# Altium PCB COMECA-PCBv1.PcbDoc
Units mm, origin at the board's own origin, x right, y up, seen from the top; angles counter-clockwise.
Board outline 177 x 172 mm, 2 copper layers (Top Layer, Bottom Layer); 114 components, 86 nets, 442 pads, 19 vias.
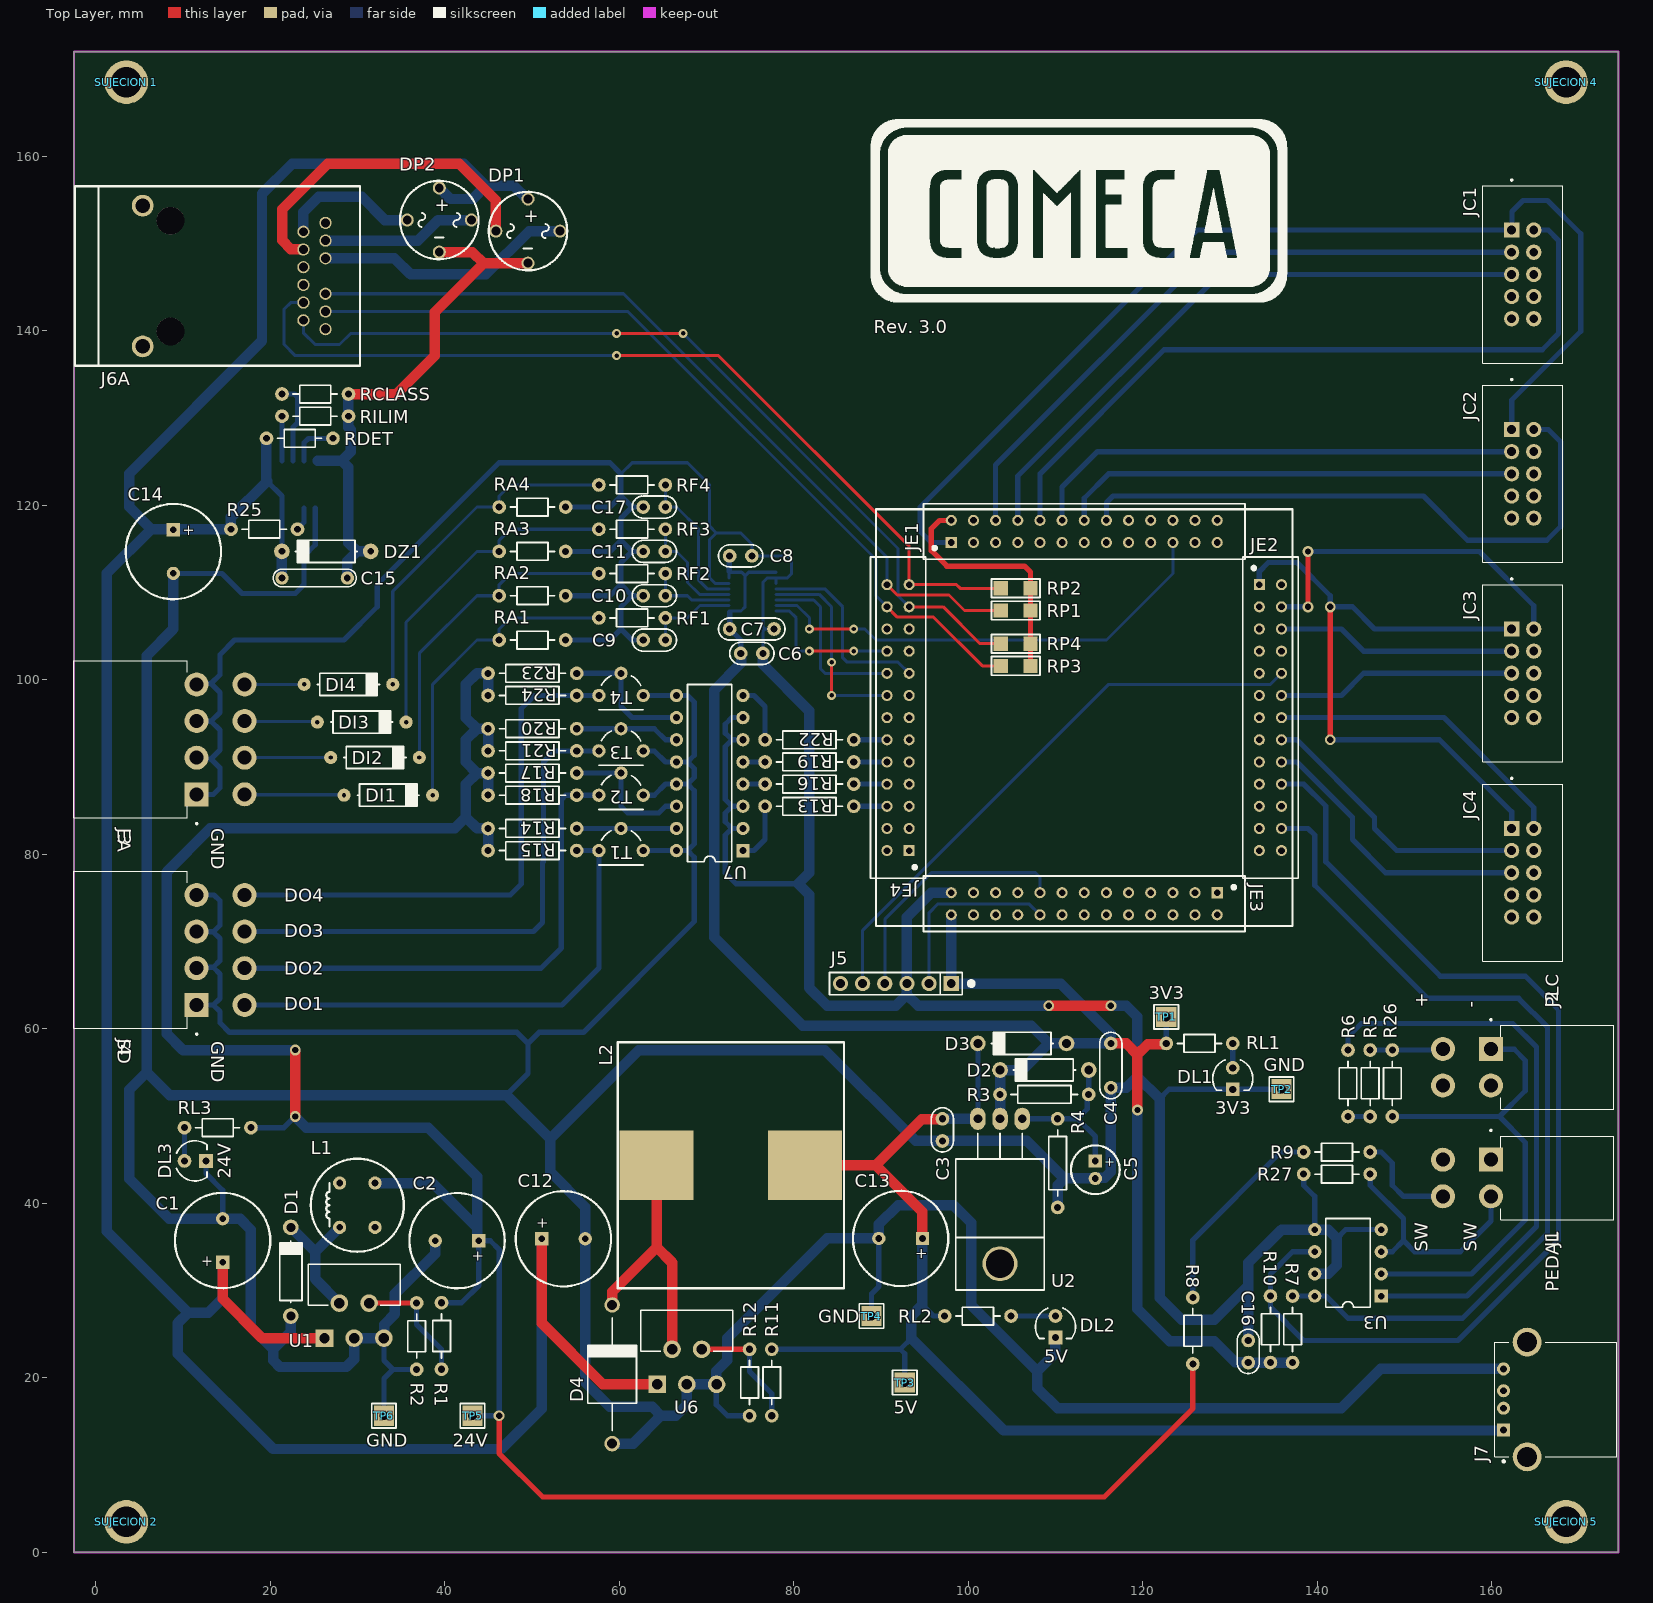
[diagram p0: Top Layer view]
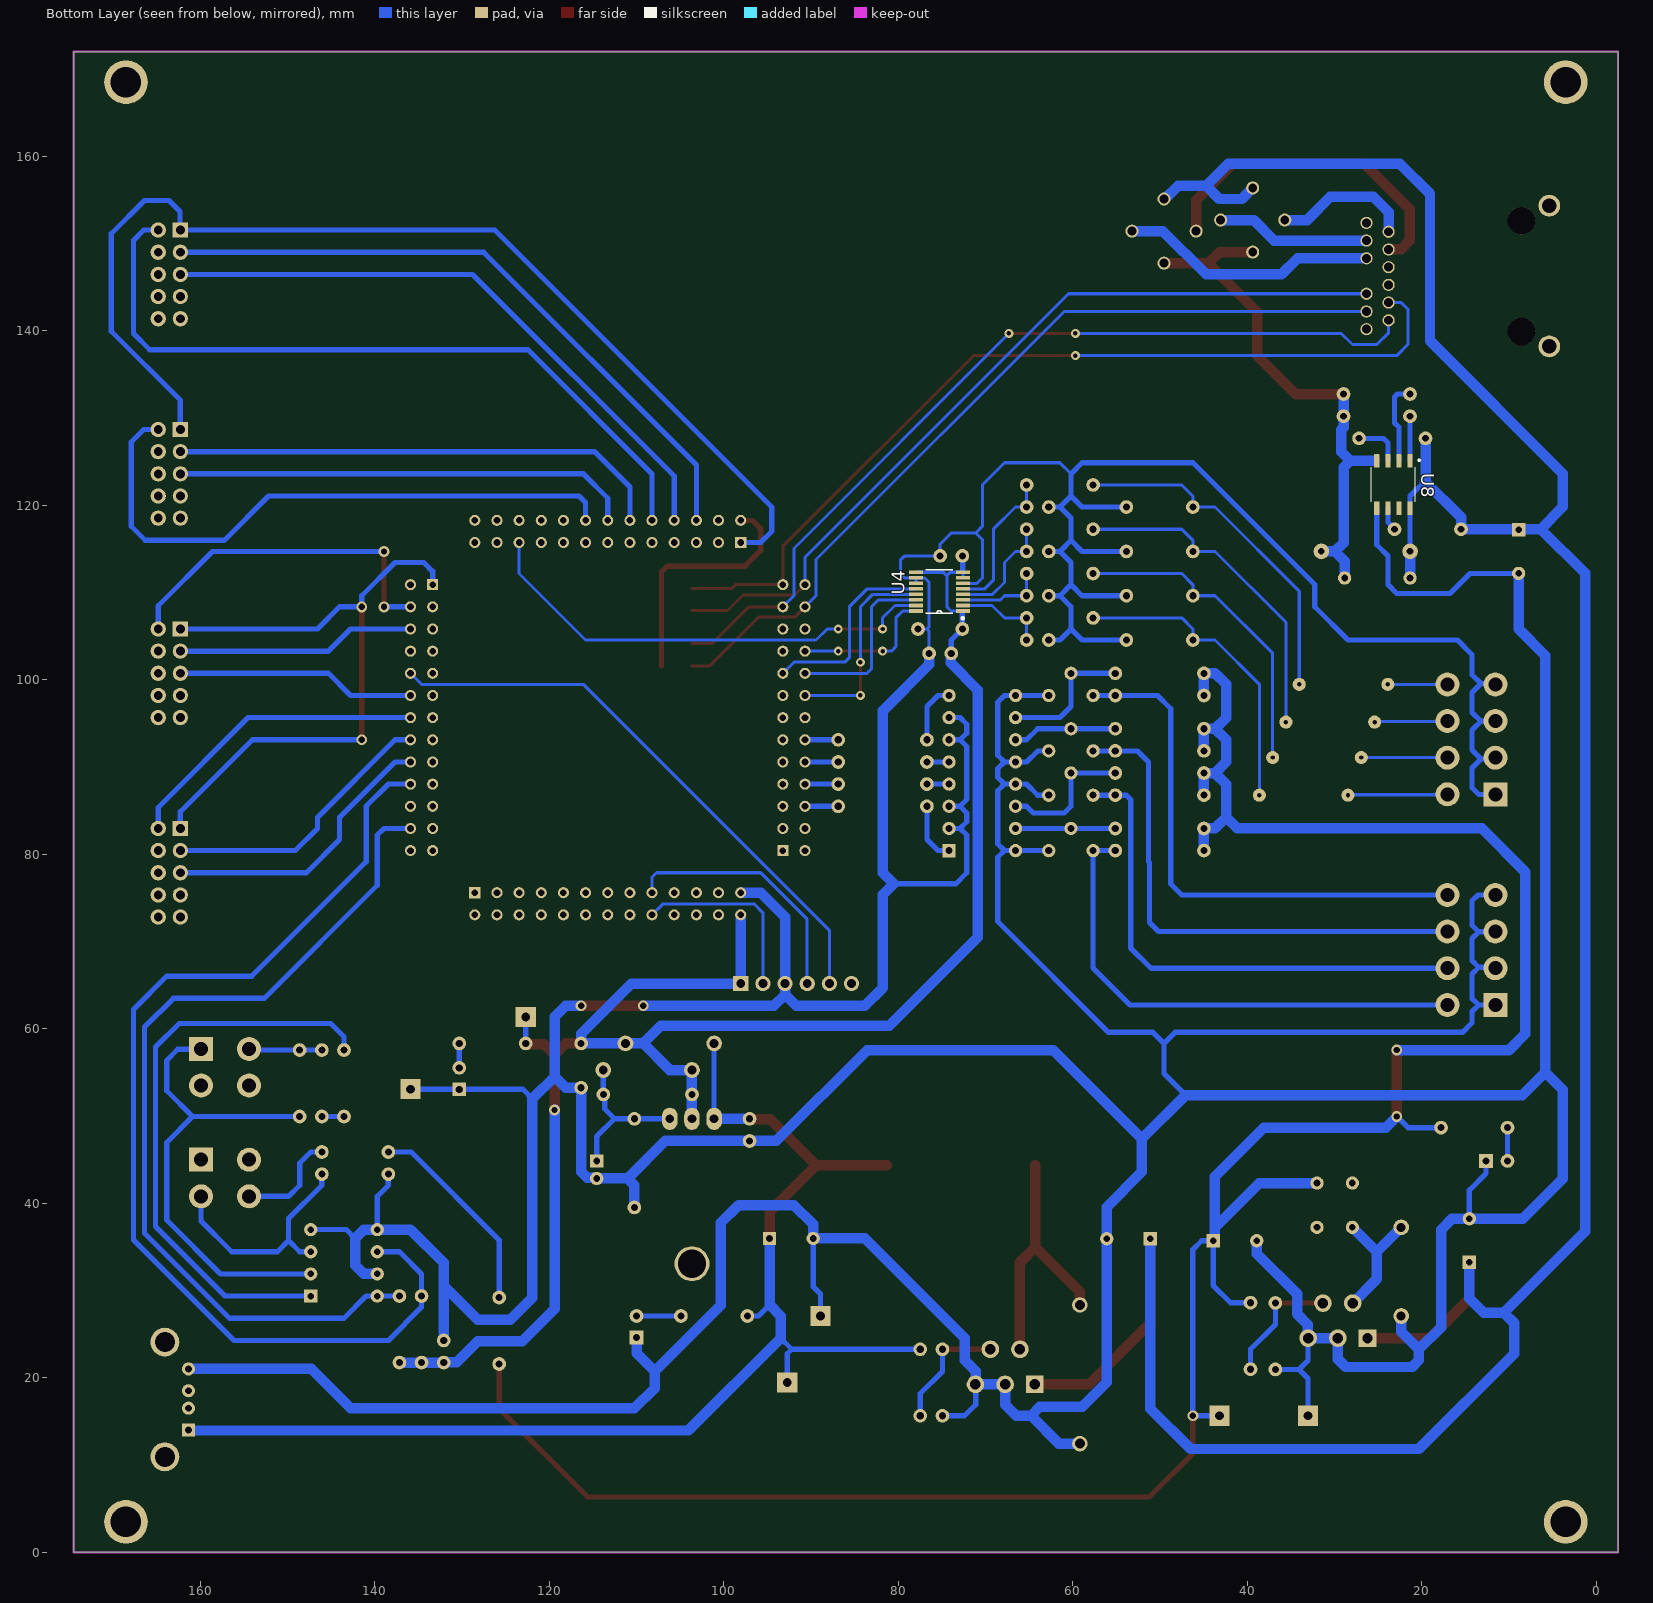
[diagram p1: Bottom Layer view, seen from below]

## Layer stack, top to bottom
Top Solder: solder mask 0.0102, Solder Resist, Dk 3.5
Top Layer: signal copper 0.0356
Dielectric 1: dielectric 0.32, FR-4, Dk 4.8
Bottom Layer: signal copper 0.0356
Bottom Solder: solder mask 0.0102, Solder Resist, Dk 3.5

## Board outline
-2.5,0 -2.5,172 174.5,172 174.5,0

## Design rules (kind name [scope] priority, off if disabled: settings)
Clearance [All] p1: gap=0.254 ignorepadtopadclearanceinfootprint=TRUE
ComponentClearance [All] p1: gap=0.22 collisioncheckmode=3 verticalgap=0.254 showdistances=FALSE
DiffPairsRouting [InDifferentialPairClass('All Differential Pairs')] p1: maxlimit=0.127 minlimit=0.127 mostfreqgap=0.127 toplayer_minwidth=0.127 toplayer_maxwidth=0.197 toplayer_prefwidth=0.197 bottomlayer_minwidth=0.127 bottomlayer_maxwidth=0.197 bottomlayer_prefwidth=0.197 maxuncoupledlength=12.7
MatchedLengths [InDifferentialPair ('RX')] p1: tolerance=25.4 checknetsindiffpair=FALSE checkdiffpairvsdiffpair=TRUE checkxsignals=TRUE checkothers=TRUE
PolygonConnect [All] p1: connectstyle=Relief reliefconductorwidth=0.254 reliefentries=4 polygonreliefangle="90 Angle" airgapwidth=0.254
RoutingVias [All] p1: holewidth=0.711 width=1.25 viastyle="Through Hole" minholewidth=0.508 minwidth=1 maxholewidth=0.711 maxwidth=1.25
SolderMaskExpansion [All] p1: expansion=0.102 istentingtop=FALSE
Width [All] p1: maxlimit=1.8 minlimit=0.35 preferedwidth=0.6
28 further rules are at their usual default settings.

## Classes and differential pairs
component class COMECA_Main: "SUJECION 1" "SUJECION 2" "SUJECION 4" "SUJECION 5"
component class U_UnidadDeControl-STM: J5 JE1 JE2 JE3 JE4
component class U_SalidasDigitales: J4 R13 R14 R15 R16 R17 R18 R19 R20 R21 R22 R23 R24 T1 T2 T3 T4 U7
component class U_Fuente24VDC: C1 C2 D1 DL3 L1 R1 R2 RL3 TP5 TP6 U1
component class U_Fuente5VDC: C12 C13 D4 DL2 J7 L2 R11 R12 RL2 TP3 TP4 U6
component class U_Fuente3.3VDC: C3 C4 C5 D2 D3 DL1 R3 R4 RL1 TP1 TP2 U2
component class U_EntradasAnalogicas: C6 C7 C8 C9 C10 C11 C17 DI1 DI2 DI3 DI4 J3 RA1 RA2 RA3 RA4 RF1 RF2 RF3 RF4 U4
component class U_ControladorPOE: C14 C15 DP1 DP2 DZ1 J6A R25 RCLASS RDET RILIM RP1 RP2 RP3 RP4 U8
component class U_ComandosExt: C16 J1 J2 R5 R6 R7 R8 R9 R10 R26 R27 U3
component class U_Calibres: JC1 JC2 JC3 JC4

## Components (designator, comment, footprint, x,y, rotation, side; value= is the part's Value field where it differs from the comment)
C1 "100uFx100V" CAP200RP 14.537,35.745 r90 top
C2 "220uFx50V" CAP200RP 41.402,35.726 r180 top
C3 "0.1uF" CAP100 97.028,48.426 r270 top
C4 "1uF" CAP200 116.332,55.792 r270 top
C5 "10uFx25V" CAP100RP 114.554,43.854 r270 top
C6 "0.1uF" CAP100 75.184,103.036 r0 top
C7 "1uF" CAP200 75.184,105.83 r0 top
C8 "0.1uF" CAP100 73.914,114.212 r0 top
C9 "0.1uF" CAP100 64.008,104.56 r180 top
C10 "0.1uF" CAP100 64.008,109.64 r180 top
C11 "0.1uF" CAP100 64.008,114.72 r180 top
C12 "100uFx100V" CAP200RP 53.594,35.94 r0 top
C13 "680uFx25V" CAP200RP 92.242,35.98 r180 top
C14 "100uFx100V" CAP200RP 8.89,114.699 r270 top
C15 "0.1uFx100V" CAP300 25.086,111.672 r0 top
C16 "0.1uF" CAP100 132.08,23.026 r90 top
C17 "0.1uF" CAP100 64.008,119.8 r180 top
D1 "MUR110" DO41#1 22.352,32.17 r90 top
D2 "1N4007" DO41#1 108.712,55.284 r180 top
D3 "1N4007" DO41#1 106.172,58.332 r180 top
D4 "MUR410" DO41-EXT 59.182,20.41 r90 top
DI1 "1N4148" DO41#2 33.528,86.78 r0 top
DI2 "1N4148" DO41#2 32.004,91.098 r0 top
DI3 "1N4148" DO41#2 30.48,95.162 r0 top
DI4 "1N4148" DO41#2 28.956,99.48 r0 top
DL1 "3V3" LED3 130.302,54.319 r270 top
DL2 "5V" LED3 109.982,25.871 r270 top
DL3 "24V" LED3 11.379,44.87 r0 top
DP1 "W10M" "PUENTE - W10M" 49.53,155.106 r0 top
DP2 "W10M" "PUENTE - W10M" 39.37,156.376 r0 top
DZ1 "1N4758" DO41#3 26.416,114.72 r180 top
J1 "PEDAL" TE_1586863-4 159.892,45.006 r90 top locked
J2 "PLC" TE_1586863-4 159.892,57.706 r90 top locked
J3 "ANALOG IN" TE_1586863-8 11.558,86.88 r270 top
J4 "DIGITAL OUT" TE_1586863-8 11.558,62.75 r270 top
J5 "PROGRAMMER" SIP6 98.044,65.19 r180 top
J6A "RJ45" ARJP11C-MB 8.554,146.279 r270 top locked
J7 "USB-TYPE-A" TE_6364372-2 164.044,17.526 r90 top locked
JC1 "CAL_1" "TE_5104338-1 - 90DEG" 162.266,151.55 r90 top locked
JC2 "CAL_2" "TE_5104338-1 - 90DEG" 162.266,128.69 r90 top locked
JC3 "CAL_3" "TE_5104338-1 - 90DEG" 162.266,105.83 r90 top locked
JC4 "CAL_4" "TE_5104338-1 - 90DEG" 162.266,82.97 r90 top locked
JE1 "SIP13" "SIP13*2 - HDR" 98.044,115.736 r0 top locked
JE2 "SIP13" "SIP13*2 - HDR" 133.35,110.91 r270 top locked
JE3 "SIP13" "SIP13*2 - HDR" 128.524,75.604 r180 top locked
JE4 "SIP13" "SIP13*2 - HDR" 93.218,80.43 r90 top locked
L1 "2200uH" CHOKE10.5 29.972,39.79 r90 top
L2 "220uH" CHOKE_PAD 72.78,44.362 r90 top
R1 "1K" RES300#1 39.624,20.994 r90 top
R2 "18K" RES300#1 36.771,20.975 r90 top
R3 "240" RES400 113.792,52.49 r180 top
R4 "390" RES400 110.236,39.536 r90 top
R5 "1K" RES300#1 146.05,57.57 r270 top
R6 "150" RES300#1 143.51,49.95 r90 top
R7 "680" RES300#1 137.16,29.376 r270 top
R8 "1K" RES300#1 125.73,21.59 r90 top
R9 "150" RES300#1 138.43,45.886 r0 top
R10 "680" RES300#1 134.62,29.376 r270 top
R11 "1K" RES300#1 77.47,15.66 r90 top
R12 "3.09K" RES300#1 74.93,15.66 r90 top
R13 "220" RES400 86.868,85.51 r180 top
R14 "4K7" RES400 55.118,82.97 r180 top
R15 "4K7" RES400 55.118,80.43 r180 top
R16 "220" RES400 86.868,88.05 r180 top
R17 "4K7" RES400 55.118,89.32 r180 top
R18 "4K7" RES400 55.118,86.78 r180 top
R19 "220" RES400 86.868,90.59 r180 top
R20 "4K7" RES400 55.118,94.4 r180 top
R21 "4K7" RES400 55.118,91.86 r180 top
R22 "220" RES400 86.868,93.13 r180 top
R23 "4K7" RES400 55.118,100.75 r180 top
R24 "4K7" RES400 55.118,98.21 r180 top
R25 "100K" RES300#2 23.114,117.26 r180 top
R26 "47K" RES300#1 148.59,49.95 r90 top
R27 "47K" RES300#1 138.43,43.346 r0 top
RA1 "150" RES300#1 53.848,104.56 r180 top
RA2 "150" RES300#1 53.848,109.64 r180 top
RA3 "150" RES300#1 53.848,114.72 r180 top
RA4 "150" RES300#1 53.848,119.8 r180 top
RCLASS "4K42" RES300#2 28.956,132.754 r180 top
RDET "24K9" RES300#2 27.178,127.674 r180 top
RF1 "3K3" RES300#1 57.658,107.1 r0 top
RF2 "3K3" RES300#1 57.658,112.18 r0 top
RF3 "3K3" RES300#1 57.658,117.26 r0 top
RF4 "3K3" RES300#1 57.658,122.34 r0 top
RILIM "160K" RES300#2 28.956,130.214 r180 top
RL1 "330" RES300#1 130.302,58.332 r180 top
RL2 "680" RES300#1 104.902,27.09 r180 top
RL3 "4K7" RES300#1 10.16,48.68 r0 top
RP1 "50" 1206 105.41,107.95 r0 top
RP2 "50" 1206 105.41,110.49 r0 top
RP3 "50" 1206 105.41,101.6 r0 top
RP4 "50" 1206 105.41,104.14 r0 top
"SUJECION 1" "SUJECION" "SUJECION (5.00MM - 3.50MM)" 3.5,168.5 r90 top
"SUJECION 2" "SUJECION" "SUJECION (5.00MM - 3.50MM)" 3.5,3.5 r90 top
"SUJECION 4" "SUJECION" "SUJECION (5.00MM - 3.50MM)" 168.5,168.5 r90 top
"SUJECION 5" "SUJECION" "SUJECION (5.00MM - 3.50MM)" 168.5,3.5 r90 top
T1 "BC338" TO92 60.198,81.7 r180 top
T2 "BC338" TO92 60.198,88.05 r180 top
T3 "BC338" TO92 60.198,93.13 r180 top
T4 "BC338" TO92 60.198,99.48 r180 top
TP1 "3V3" TPTH 122.682,61.38 r0 top
TP2 "GND" TPTH 135.89,53.086 r0 top
TP3 "5VDC" TPTH 92.71,19.47 r0 top
TP4 "GND" TPTH 88.9,27.09 r0 top
TP5 "24VDC" TPTH 43.18,15.66 r0 top
TP6 "GND" TPTH 33.02,15.66 r0 top
U1 "LM2575HV-ADJ" TO220-5 29.616,24.55 r0 top
U2 "LM317" "TO-220 H" 103.632,42.076 r180 top
U3 "TLP521" DIP8 147.32,29.376 r180 top
U4 "ADS7841E/2K5" SOP63P600X175-16N 75.278,110.109 r0 bottom
U6 "LM2576HV-ADJ" TO220-5 67.742,19.267 r0 top
U7 "CNY74-4H" DIP16 74.168,80.43 r180 top
U8 "TPS2375D" SOIC127P599X175-8N 23.241,122.386 r270 bottom

## Footprints (in the part's own frame and the unit in brackets; to place one, negate y for a bottom-side part, rotate by r counter-clockwise, add the part's x,y. Pads: shape width x height; smd on the part's side, far side on the other; paste and mask are expansions set on the pad)
1206 [mil] "Pasivo 1206"
  rect 64x64 smd: 1(-67,0) 2(67,0)
  silkscreen extent -109,-42 110,42, body extent -62,-32 63,31, height 20
ARJP11C-MB [mm] "Magjack Conector for PoE"
  round 1.4 hole 1.016: 1(5.075,15.24) 2(3.045,15.24) 3(1.015,15.24) 4(-1.015,15.24) 5(-3.045,15.24) 6(-5.075,15.24) 7(6.09,17.78) 8(4.06,17.78) 9(2.03,17.78) 10(-2.03,17.78) 11(-4.06,17.78) 12(-6.09,17.78)
  round 3.15 hole 3.175: PAD(-6.35,0) PAD(6.35,0)
  round 2.5 hole 1.651: SHIELD(-8.065,-3.18) SHIELD(8.065,-3.18)
  silkscreen extent -10.29,-10.92 10.29,21.72, body extent -10.33,-10.9 10.33,21.7, height 15.92
CAP100 [mil]
  round 62 hole 32: 1(-50,0) 2(50,0)
  silkscreen extent -100,-50 100,50, body extent -115,-33 115,34, height 241
CAP100RP [mil] "Body diameter 5mm"
  rect 60x60 hole 30: 1(-39.37,0)
  round 60 hole 30: 2(39.37,0)
  silkscreen extent -110,-110 110,110, body extent -99,-99 99,100, height 454
CAP200 [mil]
  round 62 hole 32: 1(-100,0) 2(100,0)
  silkscreen extent -150,-50 150,50, body extent -110,-46 110,44, height 246
CAP200RP [mil] "Body Diameter 10.33mm"
  rect 60x60 hole 30: 1(-98.43,0)
  round 60 hole 30: 2(98.43,0)
  silkscreen extent -215,-215 215,215, body extent -205,-204 204,205, height 787
CAP300 [mil] "Capacitor Poliester 8mm"
  round 60 hole 30: 1(-147.64,0) 2(147.64,0)
  silkscreen extent -188,-40 188,40
CHOKE10.5 [mil] "Choke Inductor 10.5mm"
  round 60 hole 30: 1(-100,80) 2(100,-80) NC(-100,-80) NC(100,80)
  silkscreen extent -210,-210 210,210, body extent -213,-213 213,213, height 715
CHOKE_PAD [mm] "Choke Inductor SMD"
  rect 8x8.5 smd: 1(0,8.5) 2(0,-8.5)
  silkscreen extent -14.1,-12.95 14.1,12.95, body extent -13.65,-11.55 13.65,11.55, height 20
DIP8 [mil]
  rect 60x60 hole 30: 1(0,0)
  round 60 hole 30: 2(0,-100) 3(0,-200) 4(0,-300) 5(300,-300) 6(300,-200) 7(300,-100) 8(300,0)
  silkscreen extent 50,-350 250,50, body extent -3,-363 303,63, height 177
DIP16 [mil]
  rect 60x60 hole 32: 1(0,0)
  round 60 hole 32: 2(0,-100) 3(0,-200) 4(0,-300) 5(0,-400) 6(0,-500) 7(0,-600) 8(0,-700) 9(300,-700) 10(300,-600) 11(300,-500) 12(300,-400) 13(300,-300) 14(300,-200) 15(300,-100) 16(300,0)
  silkscreen extent 50,-750 250,50, body extent -3,-744 307,44, height 78
DO41#1 [mm]
  round 1.8 hole 1.016: 1(-5.08,0) 2(5.08,0)
  silkscreen extent -3.56,-1.27 3.56,1.27, body extent -5.46,-1.19 5.46,1.37, height 2.03
DO41#2 [mm]
  round 1.5 hole 0.508: 1(-5.08,0) 2(5.08,0)
  silkscreen extent -3.56,-1.27 3.56,1.27, body extent -5.46,-1.19 5.46,1.37, height 2.03
DO41#3 [mm]
  round 1.8 hole 0.762: 1(-5.08,0) 2(5.08,0)
  silkscreen extent -3.56,-1.27 3.56,1.27, body extent -5.46,-1.19 5.46,1.37, height 2.03
DO41-EXT [mil]
  round 70 hole 45: 1(-312.99,0) 2(312.99,0)
  silkscreen extent -255,-110 255,110, body extent -332,-110 332,110, height 220
LED3 [mil]
  round 62 hole 32: 1(-48,0)
  rect 62x62 hole 32: 2(49,0)
  silkscreen extent -84,-90 54,90, body extent -65,-64 65,65, height 19
"PUENTE - W10M" [mm]
  round 1.5 hole 1.016: 1(0,0) 2(-3.677,-3.677) 3(0,-7.354) 4(3.677,-3.677)
  silkscreen extent -4.5,-8.18 4.5,0.82, body extent -4.82,-8.58 4.99,1.22, height 4.6
RES300#1 [mil]
  round 62 hole 32: 1(0,0) 2(300,0)
  silkscreen extent 50,-40 250,40, body extent -10,-38 310,38, height 79
RES300#2 [mil]
  round 62 hole 30: 1(0,0) 2(300,0)
  silkscreen extent 50,-40 250,40, body extent -10,-38 310,38, height 79
RES400 [mil]
  round 62 hole 32: 1(0,0) 2(400,0)
  silkscreen extent 50,-40 350,40, body extent -12,-45 412,46, height 96
SIP6 [mm]
  rect 1.75x1.75 hole 1.016: 1(0,0)
  round 1.75 hole 1.016: 2(2.54,0) 3(5.08,0) 4(7.62,0) 5(10.16,0) 6(12.7,0)
  silkscreen extent -1.27,-1.27 13.97,1.27, body extent -1.27,-1.3 13.97,1.24, height 8.38
"SIP13*2 - HDR" [mil]
  rect 50x50 hole 30: 1(0,0)
  round 50 hole 30: 2(0,100) 3(100,0) 4(100,100) 5(200,0) 6(200,100) 7(300,0) 8(300,100) 9(400,0) 10(400,100) 11(500,0) 12(500,100) 13(600,0) 14(600,100) 15(700,0) 16(700,100) 17(800,0) 18(800,100) 19(900,0) 20(900,100) 21(1000,0) 22(1000,100) 23(1100,0) 24(1100,100) 25(1200,0) 26(1200,100)
  silkscreen extent -125,-75 1325,175, body extent -60,-47 1260,148, height 335
SOIC127P599X175-8N [mm]
  rrect25% 1.55x0.6 smd mask+0.07: 1(-2.7,1.905) 2(-2.7,0.635) 3(-2.7,-0.635) 4(-2.7,-1.905) 5(2.7,-1.905) 6(2.7,-0.635) 7(2.7,0.635) 8(2.7,1.905)
  silkscreen extent -2.87,-2.52 1.95,3.04, body extent -3,-2.45 3,2.45, height 1.75
SOP63P600X175-16N [mm]
  rect 1.6x0.41 smd mask+0.05: 1(-2.7,2.222) 2(-2.7,1.587) 3(-2.7,0.952) 4(-2.7,0.317) 5(-2.7,-0.318) 6(-2.7,-0.953) 7(-2.7,-1.588) 8(-2.7,-2.223) 9(2.7,-2.223) 10(2.7,-1.588) 11(2.7,-0.953) 12(2.7,-0.318) 13(2.7,0.317) 14(2.7,0.952) 15(2.7,1.587) 16(2.7,2.222)
  silkscreen extent -2.79,-2.49 1.55,3.17, body extent -3,-2.45 3,2.45, height 1.75
"SUJECION (5.00MM - 3.50MM)" [mm]
  round 5 hole 3.5: 1(0,0)
TE_1586863-4 [mm]
  rect 2.75x2.75 hole 1.6: 1(0,0)
  round 2.75 hole 1.6: 2(0,5.5) 3(-4.2,0) 4(-4.2,5.5)
  silkscreen extent -6.9,-14.1 3.45,0.1, body extent -6.8,-14.13 3.3,6, height 11.25
TE_1586863-8 [mm]
  rect 2.75x2.75 hole 1.6: 1(0,0)
  round 2.75 hole 1.6: 2(0,5.5) 3(-4.2,0) 4(-4.2,5.5) 5(-8.4,0) 6(-8.4,5.5) 7(-12.6,0) 8(-12.6,5.5)
  silkscreen extent -15.3,-14.1 3.45,0.1, body extent -15.32,-14 3.18,6.13, height 11.25
"TE_5104338-1 - 90DEG" [mm]
  rect 1.75x1.75 hole 1.016: 1(0,0)
  round 1.75 hole 1.016: 2(0,-2.54) 3(-2.54,0) 4(-2.54,-2.54) 5(-5.08,0) 6(-5.08,-2.54) 7(-7.62,0) 8(-7.62,-2.54) 9(-10.16,0) 10(-10.16,-2.54)
  silkscreen extent -15.24,-5.84 5.83,3.3, body extent -15.24,-12.19 5.08,0.32, height 9.27
TE_6364372-2 [mm]
  rect 1.5x1.5 hole 0.762: 1(-3.5,2.71)
  round 1.5 hole 0.762: 2(-1,2.71) 3(1,2.71) 4(3.5,2.71)
  round 3.316 hole 2.3: SH1(-6.57,0) SH2(6.57,0)
  silkscreen extent -7.2,-10.28 6.57,3.72, body extent -7.26,-10.3 7.37,3.7, height 7.69
TO92 [mil]
  round 60 hole 32: 1(0,-50) 2(100,50) 3(-100,50)
  silkscreen extent -100,-39 100,115, body extent -110,-61 110,110, height 315
TO220-5 [mil]
  rect 79.5x79.5 hole 47.24: 1(-134,0)
  round 79.5 hole 47.24: 2(-67,158) 3(0,0) 4(67,158) 5(134,0)
  silkscreen extent -208,149 208,334, body extent -200,-6 200,327, height 824
"TO-220 H" [mil]
  oval 70x100 hole 40: 1(-100,-300) 2(0,-300) 3(100,-300)
  round 157.48 hole 127.95: 4(0,354.33)
  silkscreen extent -200,-235 200,472, body extent -200,-308 200,452, height 175
TPTH [mm]
  rect 2.3x2.3 hole 1.016: 1(0,0)
  silkscreen extent -1.4,-1.4 1.4,1.4, body extent -1.27,-1.27 1.27,1.27, height 6.04

## Part data
C1 C2 C5 C12 C13 C14: library part CAPPOL
C3 C4 C6 C7 C8 C9 C10 C11 C15 C16 C17: library part CAP
D1 D4: library part "DIODO SCHOTTKY"
D2 D3 DI1 DI2 DI3 DI4: library part DIODO
DL1 DL2 DL3: library part LED
DP1 DP2: "Bridge Rectifier TH 1000V 1.5A"
DZ1: library part "DIODO ZENER"
J1 J2: library part 1586863-4, "Conn Power HDR 4 POS 4.2mm Solder RA Thru-Hole 4 Terminal 1 Port Tray", Package=None, Availability=Unavailable, EU_RoHS_Compliance=Compliant, MF="TE Connectivity", MP=1586863-4, Price=None, SnapEDA_Link=https://www.snapeda.com/parts/1586863-4/TE%20Connectivity%20AMP%20Connectors/view-part/1401879/?ref=snap, TE_purchase_URL=https://www.te.com/usa-en/product-1586863-4.html?te_bu=Cor&te_type=disp&te_campaign=seda_glo_cor-seda-global-disp-prtnr-fy19-seda-model-bom-cta_sma-317_1&elqCampaignId=32493
J3 J4: library part 1586863-8, "Conn Power HDR 8 POS 4.2mm Solder RA Thru-Hole 8 Terminal 1 Port Tray", Package=None, Availability=Unavailable, EU_RoHS_Compliance=Compliant, MF="TE Connectivity", MP=1586863-8, Price=None, SnapEDA_Link=https://www.snapeda.com/parts/1586863-8/TE%20Connectivity%20AMP%20Connectors/view-part/1404500/?ref=snap, TE_purchase_URL=https://www.te.com/usa-en/product-1586863-8.html?te_bu=Cor&te_type=disp&te_campaign=seda_glo_cor-seda-global-disp-prtnr-fy19-seda-model-bom-cta_sma-317_1&elqCampaignId=32493
J5: library part CON6
J6A: library part ARJP11C-MBSC-L2, "Magjack Connector for PoE"
J7: library part 6364372-2, "Conn USB 2.0 Type A RCP 4 POS Solder RA Thru-Hole 4 Terminal 1 Port Box/Tube", Package=None, Digi-Key_Part_Number=A122647-ND, Digi-Key_Purchase_URL=https://www.digikey.com/product-detail/en/te-connectivity-amp-connectors/6364372-2/A122647-ND/2286712?utm_source=snapeda&utm_medium=aggregator&utm_campaign=symbol, EU_RoHS_Compliance=Compliant, MF="TE Connectivity", MP=6364372-2, SnapEDA_Link=https://www.snapeda.com/parts/6364372-2/TE%20Connectivity%20AMP%20Connectors/view-part/2053020/?ref=snap, TE_purchase_URL=https://www.te.com/usa-en/product-6364372-2.html?te_bu=Cor&te_type=disp&te_campaign=seda_glo_cor-seda-global-disp-prtnr-fy19-seda-model-bom-cta_sma-317_1&elqCampaignId=32493
JC1 JC2 JC3 JC4: library part 5104338-1, "HEADER; PIN; AMP-LATCH; 10 POS; 2.54 X 2.54; VERTICAL; LOW PROFILE; PCB", Package=None, Availability=Unavailable, MF="TE Connectivity", MP=5104338-1, Price=None, SnapEDA_Link=https://www.snapeda.com/parts/5104338-1/TE%20Connectivity%20AMP%20Connectors/view-part/2881080/?ref=snap, TE_purchase_URL=https://www.te.com/usa-en/product-5104338-1.html?te_bu=Cor&te_type=disp&te_campaign=seda_glo_cor-seda-global-disp-prtnr-fy19-seda-model-bom-cta_sma-317_1&elqCampaignId=32493
JE1 JE2 JE3 JE4: library part CON13*2
L1 L2: library part Choke
R1 R2 R3 R4 R5 R6 R7 R8 R9 R10 R11 R12 R13 R14 R15 R16 R17 R18 R19 R20 R21 R22 R23 R24 R25 R26 R27 RA1 RA2 RA3 RA4 RCLASS RDET RF1 RF2 RF3 RF4 RILIM RL1 RL2 RL3 RP1 RP2 RP3 RP4: library part RES
T1 T2 T3 T4: library part "TRANSISTOR NPN"
TP1 TP2 TP3 TP4 TP5 TP6: library part TP
U1 U6: library part LM257X, "Buck Switching Regulator IC Positive Output 1A TO-220-5 Formed Leads"
U2: "IC REG ADJ 1.5A 3 TERM TO-220"
U3: library part TLP521-2, "PhotoCoupler"
U4: "ANALOG-TO-DIGITAL CONVERTER", Package=None, Availability=Unavailable, MP=ADS7841E/2K5, Price=None
U8: "Class 3 PoE PD with latch protection 8-SOIC -40 to 85", Package="SOIC-8 Texas Instruments", Check_prices=https://www.snapeda.com/parts/TPS2375D/Texas%20Instruments/view-part/570877/?ref=eda, Digi-Key_Part_Number=296-26922-2-ND, MF="Texas Instruments", MP=TPS2375D, Purchase-URL=https://pricing.snapeda.com/search/part/TPS2375D/?ref=eda, SnapEDA_Link=https://www.snapeda.com/parts/TPS2375D/Texas%20Instruments/view-part/570877/?ref=snap

## Via types
v1: diameter 1.25, hole 0.711, Top Layer to Bottom Layer, 10 vias
v2: diameter 1.016, hole 0.508, Top Layer to Bottom Layer, 9 vias

## Nets (pads, with @x,y where several pads share a name; then routed paths per layer and width w, separated by ;. In a path a pad name is that pad's centre, name@x,y a point inside that pad or via, vN(x,y) a via of type N, cw(c..) or ccw(c..) an arc to the next point about the centre after c; other vN are vias at no path point)
3.3VDC: C4.1 C6.1 C7.1 C8.1 C16.1 D2.2 D3.1 J5.1 JE3.26 R3.2 R7.2 R10.2 RL1.2 TP1.1 U2.2 U4.1 U4.7 U4.8 U4.9 | length 205.3
  Top Layer w1.2: C4.1 118.11,58.332 119.38,57.062 ; v1(119.38,50.712) 119.38,57.062 ; RL1.2 122.61,58.26 120.578,58.26 119.38,57.062
  Bottom Layer w0.35: U4.1 73.939,107.887 74.422,108.37 74.422,111.926 ; U4.7 U4.8 74.016,112.332 74.422,111.926 ; U4.9 74.828,112.332 74.422,111.926
  Bottom Layer w0.6: U4.8@72.611,112.427 72.611,114.179 C8.1 ; U4.1@72.644,107.74 C7.1 73.914,104.56 C6.1 ; RL1.2 TP1.1
  Bottom Layer w1.2: C6.1 73.986,102.964 73.986,101.948 70.866,98.829 70.866,70.524 81.026,60.364 107.188,60.364 109.22,58.332 ; JE3.26 J5.1 110.571,65.19 116.332,59.429 C4.1 D3.1 109.22,58.332 ; U2.2 R3.2 D2.2 106.172,55.284 109.22,58.332 ; v1(119.38,50.712) 119.38,31.916 119.38,27.94 123.107,24.213 128.187,24.213 130.597,21.803 132.033,21.803 C16.1 R10.2 R7.2
3.3VDC_ETH: JE1.2 RP1.2 RP2.2 RP3.2 RP4.2 | length 28.3
  Top Layer w0.6: JE1.2 96.686,118.276 95.758,117.348 95.758,114.808 97.536,113.03 106.426,113.03 107.112,112.344 RP2.2 RP1.2 RP4.2 RP3.2
5VDC_OUT: C3.1 C13.1 D3.2 J7.1 L2.2 R11.2 RL2.2 TP3.1 U2.3 | length 149.1
  Top Layer w1.2: L2.2 89.408,44.362 ; C13.1 94.742,39.028 89.408,44.362 ; C3.1 96.956,49.624 94.67,49.624 89.408,44.362
  Bottom Layer w0.6: R11.2 92.202,23.28 ; TP3.1 92.71,22.772 92.202,23.28 ; 93.472,24.55 92.202,23.28 ; 94.742,28.36 96.012,27.09 RL2.2 ; U2.3 D3.2
  Bottom Layer w1.2: C13.1 94.742,28.36 93.472,27.09 93.472,24.55 104.052,13.97 161.278,13.97 J7.1 ; C3.1 U2.3
24VDC: C2.1 L1.2 R1.2 R8.1 R14.2 R15.2 R17.2 R18.2 R20.2 R21.2 R23.2 R24.2 RL3.2 TP5.1 | length 295.6
  Top Layer w0.6: v1(46.228,15.66) 46.228,11.342 51.22,6.35 115.57,6.35 125.73,16.51 R8.1
  Top Layer w1.2: v1(22.86,49.95) v1(22.86,57.57)
  Bottom Layer w0.6: RL3.2 21.576,48.68 v1@22.846,49.95 ; R1.2 41.91,28.614 43.902,30.606 C2.1 45.213,35.725 46.228,34.71 v1(46.228,15.66) TP5.1
  Bottom Layer w1.2: v1@22.846,49.95 v1(22.86,49.95) 22.874,49.95 24.144,48.68 38.1,48.68 43.74,43.04 43.74,37.198 ; v1(22.86,57.57) 9.994,57.57 8.128,59.436 8.128,77.978 13.12,82.97 41.148,82.97 42.418,84.24 ; L1.2 38.608,42.33 43.74,37.198 ; C2.1 43.74,35.888 43.74,37.198 ; R15.2 R14.2 43.688,82.97 42.418,84.24 ; R18.2 R17.2 43.688,89.32 ; R21.2 R20.2 43.688,94.4 ; R24.2 R23.2 43.688,100.75 42.418,99.48 42.418,95.67 43.688,94.4 ; 42.418,84.24 42.418,88.05 43.688,89.32 ; 43.688,89.32 42.418,90.59 42.418,93.13 43.688,94.4
AN1: DI1.1 J3.2 | length 11.4
  Bottom Layer w0.35: J3.2@17.058,86.83 28.398,86.83 DI1.1
AN2: DI2.1 J3.4 | length 9.9
  Bottom Layer w0.35: J3.4@17.058,91.089 26.915,91.089 DI2.1
AN3: DI3.1 J3.6 | length 8.4
  Bottom Layer w0.35: J3.6@17.058,95.221 25.341,95.221 DI3.1
AN4: DI4.1 J3.8 | length 6.8
  Bottom Layer w0.35: J3.8 DI4.1
ANALOG_GND_A: C1.2 C2.2 C3.2 C4.2 C5.2 C6.2 C7.2 C8.2 C9.2 C10.2 C11.2 C12.2 C13.2 C14.2 C16.2 C17.2 D1.1 D4.1 DL1.2 DL2.2 DL3.2 J3.1 J3.3 J3.5 J3.7 J4.1 J4.3 J4.5 J4.7 J5.3 J7.4 JE3.25 R2.1 R4.1 R12.1 R27.1 RA1.1 RA2.1 RA3.1 RA4.1 T1.3 T2.3 T3.3 T4.3 TP2.1 TP4.1 TP6.1 U1.3 U1.5 U3.4 U3.5 U3.7 U4.6 U4.10 U4.11 U6.3 U6.5 U7.2 U7.3 U7.6 U7.7 U7.9 U7.12 U7.13 U7.16 U8.5 | length 1083.9
  Top Layer w1.2: v1(109.22,62.65) v1(116.332,62.65)
  Bottom Layer w0.35: 60.198,123.61 61.468,124.88 67.818,124.88 70.358,122.34 70.358,117.602 71.12,116.84 ; U4.6 70.968,111.062 70.358,111.672 70.358,116.078 71.12,116.84 ; C6.2 76.454,105.576 76.708,105.83 ; C7.2 76.708,105.83 ; U4.11 U4.10 ; 71.12,116.84 73.914,116.84 75.184,115.57 C8.2 79.248,114.212 79.756,113.704 79.756,112.18 79.273,111.697 U4.10 ; 76.708,105.83 76.454,106.084 76.454,111.164 76.987,111.697 U4.10
  Bottom Layer w0.6: C14.2 14.459,112.199 16.764,109.894 22.86,109.894 23.876,110.91 23.876,114.212 25.146,115.482 U8.5 ; J4.1 11.57,62.738 13.462,62.738 ; J4.3 11.664,67.056 13.462,67.056 ; J4.5 11.588,71.12 13.462,71.12 ; J4.7 13.55,75.35 14.224,74.676 14.224,71.882 13.462,71.12 ; J3.1 11.57,86.868 13.462,86.868 14.224,87.63 14.224,89.916 13.208,90.932 ; J3.3 11.706,90.932 13.208,90.932 ; J3.5 11.588,95.25 13.208,95.25 ; J3.7 11.646,99.568 13.208,99.568 ; DL3.2 12.624,43.422 14.537,41.509 C1.2 ; TP6.1 33.02,19.939 34.055,20.975 ; U1.5 33.02,22.01 34.055,20.975 ; R2.1 34.055,20.975 ; 47.07,52.41 49.53,54.87 49.53,58.332 ; RA1.1 58.928,104.56 60.198,105.83 ; RA2.1 58.928,109.64 60.198,110.91 ; RA3.1 58.928,114.72 60.198,115.99 ; RA4.1 58.928,119.8 60.198,121.07 ; T1.3 U7.16 67.818,80.43 ; T2.3 64.008,86.78 65.278,88.05 U7.13 67.818,88.05 ; T3.3 64.008,91.86 65.278,90.59 U7.12 67.818,90.59 ; T4.3 U7.9 67.818,98.21 68.58,97.448 68.58,91.352 67.818,90.59 ; C9.2 61.468,104.56 60.198,105.83 ; C10.2 61.468,109.64 ; C11.2 61.468,114.72 ; C17.2 61.468,119.8 ; U6.5 71.12,19.241 71.12,16.93 72.39,15.66 R12.1 ; U7.2 72.898,82.97 ; U7.3 72.898,85.51 ; U7.6 72.898,93.13 ; U7.7 72.898,95.67 72.136,94.908 72.136,93.892 72.898,93.13 ; 80.518,76.62 73.406,76.62 72.136,77.89 72.136,82.208 72.898,82.97 ; TP4.1 88.9,29.63 89.742,30.472 C13.2 ; C5.2 C5.2@114.613,42.913 ; 121.92,51.982 123.012,53.074 DL1.2 135.878,53.074 TP2.1 ; R27.1 138.43,42.076 139.7,40.806 U3.5 ; 142.24,35.98 143.256,36.996 U3.4 ; 13.208,90.932 14.224,91.948 14.224,94.234 13.208,95.25 ; 13.208,95.25 14.224,96.266 14.224,98.552 13.208,99.568 ; 13.208,99.568 14.224,100.584 14.224,102.87 15.914,104.56 28.448,104.56 32.258,108.37 32.258,110.91 46.228,124.88 58.928,124.88 60.198,123.61 60.198,121.07 ; 13.462,62.738 14.224,61.976 14.224,60.706 15.328,59.602 48.26,59.602 49.53,58.332 ; 13.462,62.738 14.224,63.5 14.224,66.294 13.462,67.056 ; 13.462,67.056 14.224,67.818 14.224,70.358 13.462,71.12 ; 49.53,58.332 50.8,59.602 55.88,59.602 68.58,72.302 68.58,79.668 67.818,80.43 ; 60.198,105.83 60.198,108.37 61.468,109.64 ; 60.198,110.91 61.468,109.64 ; 60.198,110.91 60.198,113.45 61.468,114.72 ; 60.198,115.99 61.468,114.72 ; 60.198,115.99 60.198,118.53 61.468,119.8 ; 60.198,121.07 61.468,119.8 ; 67.818,80.43 68.58,81.192 68.58,87.288 67.818,88.05 ; 67.818,88.05 68.58,88.812 68.58,89.828 67.818,90.59 ; 72.898,82.97 72.136,83.732 72.136,84.748 72.898,85.51 ; 72.898,85.51 72.136,86.272 72.136,92.368 72.898,93.13
  Bottom Layer w1.2: C14.2 8.89,105.83 5.842,102.782 5.842,55.03 ; D1.1 22.352,25.312 20.32,23.28 ; C2.2 38.902,34.242 34.29,29.63 34.29,27.344 33.045,26.099 33.045,24.575 U1.5 U1.3 29.616,22.162 28.702,21.248 21.082,21.248 20.32,22.01 20.32,23.28 ; D4.1 61.57,12.46 64.77,15.66 ; C6.2 76.454,101.766 81.788,96.432 81.788,77.89 80.518,76.62 81.788,75.35 81.788,64.682 83.82,62.65 91.694,62.65 92.964,63.92 ; JE3.25 95.758,75.604 92.964,72.81 J5.3 92.964,63.92 ; v1(109.22,62.65) 94.234,62.65 92.964,63.92 ; DL2.2 109.982,22.812 107.91,20.74 ; R4.1 110.236,42.076 111.014,42.854 ; C5.2 111.014,42.854 ; C5.2@114.613,42.913 115.645,42.913 116.332,43.6 C4.2 118.11,53.252 119.38,54.522 ; v1(116.332,62.65) 118.11,62.65 119.38,61.38 119.38,54.522 ; C16.2 132.08,30.563 ; U3.7 141.224,31.916 142.24,32.932 142.24,35.98 141.224,36.996 U3.5 135.89,36.996 132.08,33.186 132.08,30.563 ; J7.4 147.264,21.026 142.748,16.51 110.236,16.51 107.91,18.836 107.91,20.74 ; 5.842,55.03 8.462,52.41 47.07,52.41 52.07,47.41 ; 5.842,55.03 3.81,52.998 3.81,42.838 8.403,38.245 C1.2 16.531,38.245 17.78,36.996 17.78,25.82 20.32,23.28 ; 52.07,47.41 62.23,57.57 83.566,57.57 93.98,47.156 C3.2 106.712,47.156 111.014,42.854 ; 52.07,47.41 52.07,43.6 56.094,39.576 C12.2 56.094,19.51 58.928,16.676 63.754,16.676 64.77,15.66 ; 64.77,15.66 66.472,15.66 67.742,16.93 U6.3 U6.5 71.12,19.292 71.12,20.74 72.39,22.01 72.39,24.55 83.82,35.98 C13.2 89.742,37.584 91.948,39.79 98.298,39.79 100.33,37.758 100.33,28.32 107.91,20.74 ; 119.38,54.522 121.92,51.982 121.92,29.21 124.46,26.67 128.187,26.67 132.08,30.563
BUSY_A: JE4.16 U4.13 | length 23.4
  Top Layer w0.35: v2(84.328,98.21) v2(84.328,102.02)
  Bottom Layer w0.35: U4.13 82.906,109.792 84.328,108.37 v2(84.328,102.02) ; v2(84.328,98.21) JE4.16
CS_A: JE1.21 U4.15 | length 54.6
  Top Layer w0.35: v2(81.788,105.83) v2(86.868,105.83)
  Bottom Layer w0.35: U4.15 80.366,108.522 81.788,107.1 v2(81.788,105.83) ; v2(86.868,105.83) 88.138,105.83 89.408,104.56 115.824,104.56 123.444,112.18 JE1.21
DCLK_A: JE4.20 U4.16 | length 16.5
  Top Layer w0.35: v2(81.788,103.29) v2(86.868,103.29)
  Bottom Layer w0.35: U4.16 79.477,107.887 80.264,107.1 80.264,103.798 80.772,103.29 v2(81.788,103.29) ; v2(86.868,103.29) JE4.20
DIG_OUT1: J4.2 R15.1 T1.2 | length 58.3
  Bottom Layer w0.6: J4.2 53.44,62.75 57.658,66.968 T1.2 R15.1
DIG_OUT2: J4.4 R18.1 T2.2 | length 58.8
  Bottom Layer w0.6: J4.4 51.036,66.95 53.358,69.272 53.358,86.29 53.848,86.78 R18.1 T2.2
DIG_OUT3: J4.6 R21.1 T3.2 | length 59.9
  Bottom Layer w0.6: J4.6 50.156,71.15 51.19,72.184 51.19,79.042 51.308,79.16 51.308,90.59 52.578,91.86 R21.1 T3.2
DIG_OUT4: J4.8 R24.1 T4.2 | length 61.8
  Bottom Layer w0.6: J4.8 47.498,75.35 48.768,76.62 48.768,96.686 50.292,98.21 R24.1 T4.2
DIN_A: JE4.18 U4.14 | length 20.3
  Bottom Layer w0.35: U4.14 82.271,109.157 83.058,108.37 83.058,101.258 83.566,100.75 JE4.18
DOUT_A: JE4.17 U4.12 | length 22.7
  Bottom Layer w0.35: U4.12 83.541,110.427 85.598,108.37 85.598,102.528 86.106,102.02 91.948,102.02 JE4.17
GND1: JC1.1 JC2.1 JE1.1 | length 125.6
  Bottom Layer w0.6: JE1.1 95.758,115.736 94.488,117.006 94.488,119.8 126.238,151.55 JC1.1 162.306,151.59 162.306,153.67 163.576,154.94 166.37,154.94 170.18,151.13 170.18,139.954 162.266,132.04 JC2.1
GND2: JC3.1 JC4.1 JE2.1 | length 76.1
  Top Layer w0.6: v1(141.478,93.13) v1(141.478,108.37)
  Bottom Layer w0.6: JE2.1 133.35,112.434 134.366,113.45 137.668,113.45 141.478,109.64 v1(141.478,108.37) 144.018,108.37 146.558,105.83 JC3.1 ; v1(141.478,93.13) 154.012,93.13 162.266,84.876 JC4.1
NetC5_1: C5.1 D2.1 R3.1 R4.2 U2.1 | length 18.1
  Bottom Layer w0.6: U2.1 R4.2 112.522,49.696 ; D2.1 R3.1 113.629,52.327 113.629,50.803 112.522,49.696 ; C5.1 114.554,47.664 112.522,49.696
NetD1_2: D1.2 L1.1 U1.2 | length 15
  Bottom Layer w0.6: D1.2@22.313,37.211 D1.2
  Bottom Layer w1.2: D1.2 25.146,34.456 ; U1.2 25.146,31.332 25.146,34.456 ; L1.1 25.146,34.456
NetD4_2: D4.2 L2.1 U6.2 | length 30.5
  Top Layer w1.2: D4.2 59.182,29.884 64.28,34.982 ; L2.1 64.28,34.982 ; U6.2 66.04,33.222 64.28,34.982
NetDI1_2: DI1.2 RA1.2 RF1.1 | length 35.7
  Bottom Layer w0.35: DI1.2 38.608,99.48 43.688,104.56 RA1.2 46.228,105.83 47.498,107.1 RF1.1
NetDI2_2: DI2.2 RA2.2 RF2.1 | length 37
  Bottom Layer w0.35: DI2.2 37.084,103.036 43.688,109.64 RA2.2 46.228,110.91 47.498,112.18 RF2.1
NetDI3_2: DI3.2 RA3.2 RF3.1 | length 38.7
  Bottom Layer w0.35: DI3.2 35.56,106.592 43.688,114.72 RA3.2 46.228,115.99 47.498,117.26 RF3.1
NetDI4_2: DI4.2 RA4.2 RF4.1 | length 40.1
  Bottom Layer w0.35: DI4.2 34.036,110.148 43.688,119.8 RA4.2 46.228,121.07 47.498,122.34 RF4.1
NetDL1_1: DL1.1 RL1.1 | length 2.8
  Bottom Layer w0.6: DL1.1 RL1.1
NetDL2_1: DL2.1 RL2.1 | length 5.1
  Bottom Layer w0.6: RL2.1 DL2.1
NetDL3_1: DL3.1 RL3.1 | length 3.8
  Bottom Layer w0.6: DL3.1 RL3.1
NetJ1_3: J1.3 R27.2 U3.3 | length 27.1
  Bottom Layer w0.6: R27.2 146.05,42.076 149.86,38.266 149.86,35.726 ; U3.3 148.59,34.456 149.86,35.726 ; J1.3 159.892,37.972 156.376,34.456 151.13,34.456 149.86,35.726
NetJ1_4: J1.4 R9.2 | length 11.9
  Bottom Layer w0.6: R9.2 147.32,45.886 148.59,44.616 148.59,42.076 149.86,40.806 J1.4
NetJ2_2: J2.2 R5.1 R26.2 | length 8.4
  Bottom Layer w0.6: R5.1 R26.2 154.256,57.57 J2.2
NetR1_1: R1.1 R2.2 U1.4 | length 14.2
  Top Layer w0.6: U1.4@31.334,28.579 R2.2@36.755,28.579
  Bottom Layer w0.6: U1.4 U1.4@31.334,28.579 ; R2.2@36.755,28.579 R2.2 36.771,26.133 39.624,23.28 R1.1
NetR5_2: R5.2 R6.1 | length 2.5
  Bottom Layer w0.6: R6.1 R5.2
NetR6_2: R6.2 U3.1 | length 66.5
  Bottom Layer w0.6: R6.2 143.51,59.094 145.034,60.618 162.394,60.618 165.1,57.912 165.1,37.338 157.138,29.376 U3.1
NetR8_2: R8.2 R9.1 | length 23.5
  Bottom Layer w0.6: R8.2 125.73,35.814 135.802,45.886 R9.1
NetR11_1: R11.1 R12.2 U6.4 | length 14.2
  Top Layer w0.6: U6.4 R12.2
  Bottom Layer w0.6: R12.2 74.93,20.74 77.47,18.2 R11.1
NetR13_2: R13.2 U7.1 | length 6.9
  Bottom Layer w0.6: U7.1 75.438,80.43 76.708,81.7 R13.2
NetR14_1: R14.1 T1.1 U7.15 | length 11.4
  Bottom Layer w0.6: R14.1 T1.1 U7.15
NetR16_2: R16.2 U7.4 | length 2.5
  Bottom Layer w0.6: U7.4 R16.2
NetR17_1: R17.1 T2.1 U7.14 | length 15.9
  Bottom Layer w0.6: R17.1 T2.1 60.198,85.51 60.96,84.748 64.516,84.748 65.278,85.51 U7.14
NetR19_2: R19.2 U7.5 | length 2.5
  Bottom Layer w0.6: U7.5 R19.2
NetR20_1: R20.1 T3.1 U7.11 | length 12
  Bottom Layer w0.6: R20.1 T3.1 64.008,94.4 65.278,93.13 U7.11
NetR22_2: R22.2 U7.8 | length 6.9
  Bottom Layer w0.6: U7.8 75.438,98.21 76.708,96.94 R22.2
NetR23_1: R23.1 T4.1 U7.10 | length 15.8
  Bottom Layer w0.6: R23.1 T4.1 60.198,96.94 61.468,95.67 U7.10
NetR25_1: R25.1 U8.6 | length 2.7
  Bottom Layer w0.6: R25.1 23.114,117.3 23.876,118.062 U8.6
NetRCLASS_2: RCLASS.2 U8.2 | length 9.5
  Bottom Layer w0.6: RCLASS.2 22.763,132.754 23.114,132.403 23.114,129.452 22.606,128.944 U8.2
NetRDET_1: RDET.1 U8.3 | length 5.6
  Bottom Layer w0.6: U8.3 23.876,127.166 24.384,127.674 RDET.1
NetRILIM_2: RILIM.2 U8.1 | length 5.1
  Bottom Layer w0.6: U8.1 RILIM.2
PA0: JC3.2 JE2.4 | length 40.5
  Top Layer w0.6: v1(138.938,108.37) v1(138.938,114.72)
  Bottom Layer w0.6: JE2.4 v1(138.938,108.37) ; v1(138.938,114.72) 158.584,114.72 164.806,108.498 JC3.2
PA13: J5.4 JE3.17 | length 29.3
  Bottom Layer w0.35: J5.4 90.424,72.556 95.758,77.89 107.696,77.89 108.204,77.382 JE3.17
PA14: J5.2 JE3.18 | length 21.8
  Bottom Layer w0.35: J5.2 95.504,73.318 96.52,74.334 106.934,74.334 JE3.18
PB1: JC2.2 JE1.16 | length 70.5
  Bottom Layer w0.6: JE1.16 115.824,120.308 116.586,121.07 152.146,121.07 157.226,115.99 166.282,115.99 167.894,117.602 167.894,127.254 166.458,128.69 JC2.2
PB6: JE2.24 R7.1 U3.8 | length 101.2
  Bottom Layer w0.6: JE2.24 138.938,82.97 139.7,82.208 139.7,76.454 152.654,63.5 163.068,63.5 166.37,60.198 166.37,36.576 156.63,26.836 143.51,26.836 140.97,29.376 U3.8 R7.1
PB8: JE2.20 R10.1 U3.6 | length 121.9
  Bottom Layer w0.6: JE2.20 138.43,88.05 140.97,85.51 140.97,79.16 154.09,66.04 163.83,66.04 167.64,62.23 167.64,35.814 156.122,24.296 138.43,24.296 134.62,28.106 R10.1 134.62,31.916 137.16,34.456 U3.6
PC3: JC3.3 JE2.6 | length 27.4
  Bottom Layer w0.6: JE2.6 142.748,105.83 145.288,103.29 JC3.3
PC7: JE4.8 R16.1 | length 3.8
  Bottom Layer w0.6: R16.1 JE4.8
PC9: JE4.6 R13.1 | length 3.8
  Bottom Layer w0.6: R13.1 JE4.6
PD13: JE4.12 R22.1 | length 3.8
  Bottom Layer w0.6: R22.1 JE4.12
PD15: JE4.10 R19.1 | length 3.8
  Bottom Layer w0.6: R19.1 JE4.10
PE0: JC4.5 JE2.18 | length 33.1
  Bottom Layer w0.6: JE2.18 137.668,90.59 144.018,84.24 144.018,81.7 147.828,77.89 JC4.5
PE2: JC4.3 JE2.16 | length 32.4
  Bottom Layer w0.6: JE2.16 137.668,93.13 146.558,84.24 146.558,82.97 149.098,80.43 JC4.3
PE4: JC4.2 JE2.14 | length 35.6
  Bottom Layer w0.6: JE2.14 154.52,95.67 164.806,85.384 JC4.2
PE6: JC3.5 JE2.12 | length 27.4
  Bottom Layer w0.6: JE2.12 142.748,98.21 145.288,100.75 JC3.5
PE7: JC2.5 JE1.14 | length 52.7
  Bottom Layer w0.6: JE1.14 113.284,120.816 116.078,123.61 JC2.5
PE9: JC2.3 JE1.12 | length 57
  Bottom Layer w0.6: JE1.12 110.744,122.086 114.808,126.15 JC2.3
PE11: JC1.2 JE1.10 | length 85.4
  Bottom Layer w0.6: JE1.10 108.204,123.61 122.428,137.834 165.774,137.834 167.64,139.7 167.64,150.368 166.458,151.55 JC1.2
PE13: JC1.5 JE1.8 | length 71.3
  Bottom Layer w0.6: JE1.8 105.664,123.356 128.778,146.47 JC1.5
PE15: JC1.3 JE1.6 | length 75.6
  Bottom Layer w0.6: JE1.6 103.124,124.626 127.508,149.01 JC1.3
PLC_GND: J2.1 R26.1 U3.2 | length 56.6
  Bottom Layer w0.6: U3.2 157.646,31.916 163.83,38.1 163.83,46.99 160.87,49.95 ; R26.1 160.87,49.95 ; J2.1 159.94,57.658 162.56,57.658 163.83,56.388 163.83,52.91 160.87,49.95
RA1: C9.1 RF1.2 U4.2 | length 10.4
  Bottom Layer w0.35: C9.1 RF1.2 67.818,107.1 69.24,108.522 U4.2
RA2: C10.1 RF2.2 U4.3 | length 10
  Bottom Layer w0.35: RF2.2 C10.1 67.818,109.64 68.301,109.157 U4.3
RA3: C11.1 RF3.2 U4.4 | length 13.2
  Bottom Layer w0.35: RF3.2 C11.1 66.548,114.72 67.818,113.45 67.818,111.164 69.19,109.792 U4.4
RA4: C17.1 RF4.2 U4.5 | length 17.1
  Bottom Layer w0.35: RF4.2 C17.1 66.548,119.8 69.088,117.26 69.088,111.418 70.079,110.427 U4.5
RST: J5.5 JE2.10 | length 66.3
  Bottom Layer w0.35: J5.5 87.884,71.286 116.078,99.48 134.62,99.48 JE2.10
RX_N: J6A.8 JE4.24 RP3.1 | length 96.6
  Top Layer w0.35: JE4.24 91.86,107.188 96.012,107.188 101.6,101.6 RP3.1
  Bottom Layer w0.35: J6A.8 60.981,142.219 89.408,113.792 89.408,109.64 JE4.24
RX_P: J6A.1 JE4.23 RP4.1 | length 100.3
  Top Layer w0.35: v2(59.69,139.7) v2(67.31,139.7) ; JE4.23 97.116,108.37 101.346,104.14 RP4.1
  Bottom Layer w0.35: J6A.1 23.794,139.782 25.146,138.43 27.94,138.43 29.21,139.7 v2(59.69,139.7) ; v2(67.31,139.7) 91.948,115.062 91.948,109.64 JE4.23
TX_N: J6A.9 JE4.26 RP1.1 | length 94.2
  Top Layer w0.35: JE4.26 91.86,109.728 97.79,109.728 99.568,107.95 RP1.1
  Bottom Layer w0.35: J6A.9 60.475,144.249 90.678,114.046 JE4.26
TX_P: J6A.2 JE4.25 RP2.1 | length 102.8
  Top Layer w0.35: v2(59.69,137.16) 71.374,137.16 93.218,115.316 JE4.25 98.64,110.91 99.06,110.49 RP2.1
  Bottom Layer w0.35: J6A.2 22.33,143.234 21.59,142.494 21.59,138.43 22.86,137.16 v2(59.69,137.16)
VC1+: DP1.2 J6A.5 | length 38.4
  Top Layer w1.2: J6A.5 23.766,149.352 22.352,149.352 21.346,150.358 21.346,153.934 26.582,159.17 41.656,159.17 45.853,154.973 DP1.2
VC1-: DP1.4 J6A.10 | length 29.7
  Bottom Layer w1.2: J6A.10 34.229,148.309 36.068,146.47 44.704,146.47 49.663,151.429 DP1.4
VC2+: DP2.2 J6A.6 | length 16
  Bottom Layer w1.2: J6A.6 23.794,153.588 25.566,155.36 30.48,155.36 33.141,152.699 DP2.2
VC2-: DP2.4 J6A.11 | length 17.7
  Bottom Layer w1.2: J6A.11 36.889,150.339 39.249,152.699 DP2.4
VDD: C1.1 C12.1 C14.1 C15.1 DP1.1 DP2.1 DZ1.2 R25.2 RDET.2 U1.1 U6.1 U8.8 | length 339.8
  Top Layer w1.2: C1.1 14.537,29.063 19.05,24.55 U1.1 ; C12.1 51.094,26.288 58.115,19.267 U6.1
  Bottom Layer w0.6: 19.641,122.765 21.336,121.07 U8.8 DZ1.2
  Bottom Layer w1.2: C1.1 14.537,29.141 12.886,27.49 10.6,27.49 ; 19.558,122.848 RDET.2 ; 19.641,122.765 15.494,118.618 R25.2 8.951,117.26 C14.1 8.81,117.279 6.35,117.279 ; C15.1 DZ1.2 ; DP2.1 40.64,155.106 43.18,155.106 44.704,156.63 ; DP1.1 49.449,155.106 47.925,156.63 44.704,156.63 ; C12.1 51.094,16.462 46.482,11.85 20.32,11.85 9.398,22.772 9.398,26.288 10.6,27.49 ; 6.35,117.279 1.27,112.199 1.27,36.821 10.6,27.49 ; 6.35,117.279 3.81,119.819 3.81,123.61 19.05,138.85 19.05,155.702 22.518,159.17 42.164,159.17 44.704,156.63
VSS: C15.2 DP1.3 DP2.3 DZ1.1 RCLASS.1 RILIM.1 U8.4 | length 62.4
  Top Layer w1.2: RCLASS.1 34.456,132.754 38.862,137.16 38.862,142.152 44.45,147.74 ; DP2.3 43.168,149.022 44.45,147.74 ; DP1.3@49.518,147.74 44.45,147.74
  Bottom Layer w1.2: 25.451,125.134 28.194,125.134 ; C15.2 28.836,113.584 29.972,114.72 ; RCLASS.1 RILIM.1 28.956,128.944 29.21,128.69 29.21,126.15 28.194,125.134 ; DZ1.1 29.972,114.72 ; 28.194,125.134 28.956,124.372 28.956,115.736 29.972,114.72
pads on no net: "SUJECION 1.1" "SUJECION 2.1" "SUJECION 4.1" "SUJECION 5.1" J1.1 J1.2 J2.3 J2.4 J5.6 J6A.3 J6A.4 J6A.7 J6A.12 J6A.PAD J6A.SHIELD J7.2 J7.3 J7.SH1 J7.SH2 JC1.4 JC1.6 JC1.7 JC1.8 JC1.9 JC1.10 JC2.4 JC2.6 JC2.7 JC2.8 JC2.9 JC2.10 JC3.4 JC3.6 JC3.7 JC3.8 JC3.9 JC3.10 JC4.4 JC4.6 JC4.7 JC4.8 JC4.9 JC4.10 JE1.3 JE1.4 JE1.5 JE1.7 JE1.9 JE1.11 JE1.13 JE1.15 JE1.17 JE1.18 JE1.19 JE1.20 JE1.22 JE1.23 JE1.24 JE1.25 JE1.26 JE2.2 JE2.3 JE2.5 JE2.7 JE2.8 JE2.9 JE2.11 JE2.13 JE2.15 JE2.17 JE2.19 JE2.21 JE2.22 JE2.23 JE2.25 JE2.26 JE3.1 JE3.2 JE3.3 JE3.4 JE3.5 JE3.6 JE3.7 JE3.8 JE3.9 JE3.10 JE3.11 JE3.12 JE3.13 JE3.14 JE3.15 JE3.16 JE3.19 JE3.20 JE3.21 JE3.22 JE3.23 JE3.24 JE4.1 JE4.2 JE4.3 JE4.4 JE4.5 JE4.7 JE4.9 JE4.11 JE4.13 JE4.14 JE4.15 JE4.19 JE4.21 JE4.22 L1.NC U2.4 U8.7

## Keep-outs
Keep-Out Layer:
  the board outline again, w0.254

## Silkscreen, mask and mechanical layers (free items; w line width, h text height)
Top Overlay:
  drawing of 9 lines, arcs and shapes, not listed
  text "Rev. 3.0" at 89.154,139.7 h1.52
  text "EA" at 2.54,82.97 h1.52 r270
  text "GND" at 13.208,82.97 h1.52 r270
  text "DO4" at 21.59,74.588 h1.52
  text "DO3" at 21.59,70.524 h1.52
  text "DO2" at 21.59,66.206 h1.52
  text "3V3" at 120.65,63.412 h1.52
  text "+" at 152.654,62.396 h1.52 r90
  text "-" at 158.242,62.396 h1.52 r90
  text "PLC" at 167.64,62.396 h1.52 r90
  text "DO1" at 21.59,62.142 h1.52
  text "SD" at 2.54,58.84 h1.52 r270
  text "GND" at 13.208,58.586 h1.52 r270
  text "GND" at 133.858,55.118 h1.52
  text "3V3" at 128.27,50.204 h1.52
  text "24V" at 15.494,42.838 h1.52 r90
  text "SW" at 152.654,34.456 h1.52 r90
  text "SW" at 158.242,34.456 h1.52 r90
  text "PEDAL" at 167.64,29.884 h1.52 r90
  text "GND" at 82.804,26.328 h1.52
  text "5V" at 108.712,21.756 h1.52
  text "5V" at 91.44,15.914 h1.52
  text "GND" at 30.988,12.104 h1.52
  text "24V" at 40.894,12.104 h1.52

## Text inside footprints (layer, text, board x,y; h text height)
C1: Top Overlay "+" at 13.293,32.621 h1.27 r90
C2: Top Overlay "+" at 44.526,34.481 h1.27 r180
C5: Top Overlay "+" at 115.722,45.302 h1.02 r270
C12: Top Overlay "+" at 50.47,37.185 h1.27
C13: Top Overlay "+" at 95.366,34.735 h1.27 r180
C14: Top Overlay "+" at 10.135,117.823 h1.27 r270
DP1: Top Overlay "+" at 49.03,152.429 h1.52
DP2: Top Overlay "+" at 38.87,153.699 h1.52